# Altium PCB NB3000XN.PcbDoc (part 52 of 71)
Units mil, origin at the board's own origin, x right, y up, seen from the top; angles counter-clockwise.
Board outline 9527.56 x 6929.77 mil, 6 copper layers (Top Layer, GND+SHIELD, MidLayer1, MidLayer2, P2 - 3V3+5V0, Bottom Layer), stack 62.375 mil thick; 832 components, 1027 nets, 4655 pads, 4981 vias.
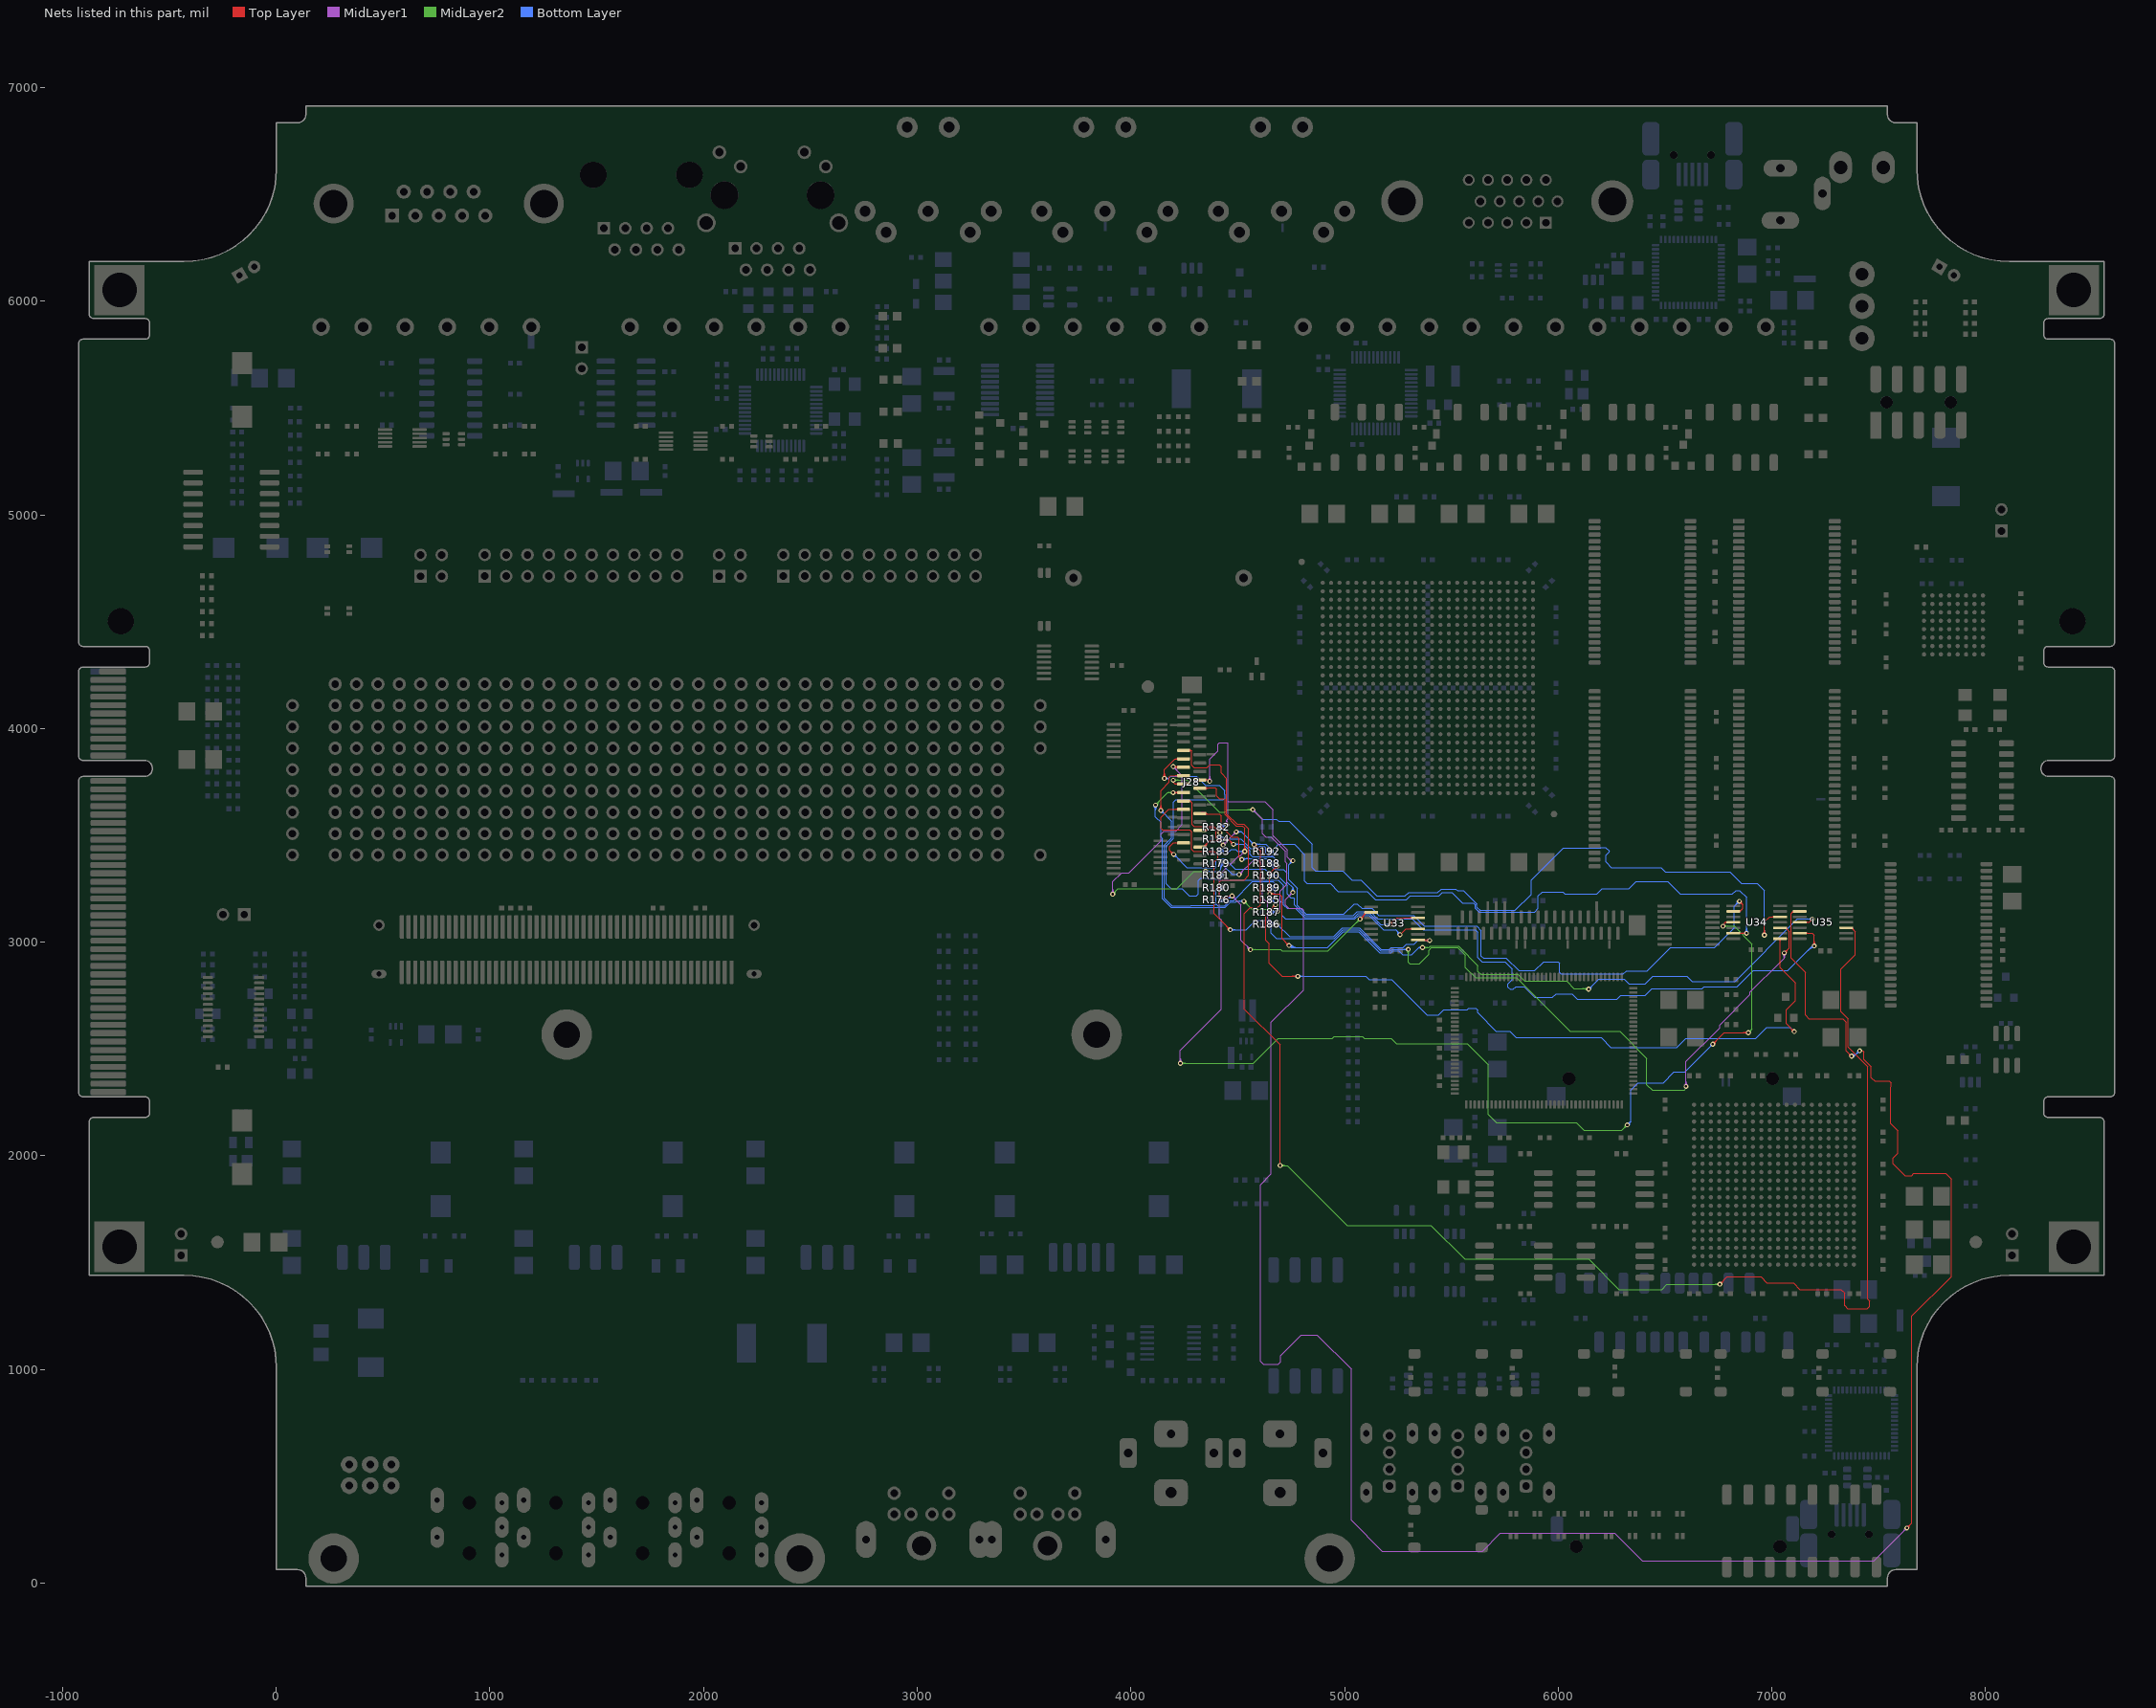
[diagram p56: the nets of this part, all layers, seen from the top]

## Via types
v1: diameter 23, hole 11.81, Top Layer to Bottom Layer, 3672 vias
v2: diameter 26, hole 11.81, Top Layer to Bottom Layer, 461 vias
v3: diameter 19, hole 11.81, Top Layer to Bottom Layer, tented both sides, 396 vias
v4: diameter 23.62, hole 11.81, Top Layer to Bottom Layer, 288 vias
v5: diameter 20, hole 11.81, Top Layer to Bottom Layer, 91 vias
v6: diameter 23, hole 11.81, Top Layer to Bottom Layer, tented both sides, 50 vias
v7: diameter 31, hole 11.81, Top Layer to Bottom Layer, 15 vias
v8: diameter 27.56, hole 11.81, Top Layer to Bottom Layer, tented both sides, 4 vias
v9: diameter 29, hole 11.81, Top Layer to Bottom Layer, 3 vias
v10: diameter 21, hole 11.81, Top Layer to Bottom Layer, 1 vias

## Nets (pads, with @x,y where several pads share a name; then routed paths per layer and width w, separated by ;. In a path a pad name is that pad's centre, name@x,y a point inside that pad or via, vN(x,y) a via of type N, cw(c..) or ccw(c..) an arc to the next point about the centre after c; other vN are vias at no path point) (continued)
LEDS#.LED2.RED: J28.13 R176.2 U33.2 | length 2543.8
  Top Layer w4: J28.13@4246.61,3897.64 4281.86,3897.64 ; J28.13@4273.12,3893.73 cw(c4281.86,3885.93) 4281.86,3897.64 ; J28.13@4273.12,3901.55 ccw(c4281.86,3909.34) 4281.86,3897.64 ; 4451.86,3210 4458.56,3216.71 ; v1(4473.52,3216.71) 4458.56,3216.71 ; v1(5073.52,3108.37) 5098.52,3133.37 ; v1@5073.52,3113.87 ccw(c5073.52,3127.15) 5082.91,3117.76 ccw(c5092.3,3108.37) v1@5079.02,3108.37 ; v1@5073.52,3117.87 ccw(c5073.52,3140.81) 5089.74,3124.59 ccw(c5105.96,3108.37) v1@5083.02,3108.37 ; 5087.42,3122.27 ccw(c5070.28,3139.41) U33.2@5094.52,3139.41 ; 5094.25,3129.1 ccw(c5083.94,3139.41) U33.2@5098.52,3139.41 ; U33.2@5096.97,3135.72 cw(c5095.97,3133.38) 5098.52,3133.38 ; U33.2@5100.08,3135.73 ccw(c5101.08,3133.38) 5098.52,3133.38 ; U33.2@5125,3139.41 U33.2@5098.52,3139.41 ; 4281.86,3897.64 4283.52,3895.97 4283.52,3828.71 4295.52,3816.71 4356.71,3816.71 4370.58,3830.58 4415,3830.58 4423.52,3822.06 4423.52,3791.71 4448.52,3766.71 4448.52,3606.71 4448.52,3601 4496.82,3552.71 4529.19,3552.71 4551.19,3530.71 4551.19,3312.9 4530,3291.71 4425.19,3291.71 4415.19,3281.71 4415.19,3216.71 4423.52,3208.37 4450.23,3208.37 4458.56,3216.71 ; 5098.52,3133.37 U33.2@5098.52,3139.41
  MidLayer1 w4: v1@4473.52,3207.21 cw(c4473.52,3184.27) 4489.74,3200.49 cw(c4505.96,3216.71) v1@4483.02,3216.71 ; v1@4473.52,3211.21 cw(c4473.52,3197.93) 4482.91,3207.32 cw(c4492.3,3216.71) v1@4479.02,3216.71 ; v1(4473.52,3216.71) 4515.19,3175.04 4515.19,3009.37 v1(4559.52,2965.04) ; v1@4550.02,2965.04 ccw(c4527.09,2965.04) 4543.31,2981.26 ccw(c4559.52,2997.48) v1@4559.52,2974.54 ; v1@4554.02,2965.04 ccw(c4540.75,2965.04) 4550.14,2974.43 ccw(c4559.52,2983.82) v1@4559.52,2970.54
  MidLayer2 w4: v1(4559.52,2965.04) 4700.19,2965.04 4706.86,2958.37 4923.52,2958.37 v1(5073.52,3108.37) ; v1@4563.41,2961.15 cw(c4572.8,2951.76) 4572.8,2965.04 cw(c4572.8,2978.32) v1@4563.41,2968.93 ; v1@4566.24,2958.32 cw(c4582.46,2942.11) 4582.46,2965.04 cw(c4582.46,2987.98) v1@4566.24,2971.76 ; v1@5064.02,3108.37 cw(c5041.09,3108.37) 5057.31,3092.16 cw(c5073.52,3075.94) v1@5073.52,3098.87 ; v1@5068.02,3108.37 cw(c5054.75,3108.37) 5064.14,3098.99 cw(c5073.52,3089.6) v1@5073.52,3102.87
  Bottom Layer w4: R176.2@4421.18,3198.75 4440.86,3198.75 ; R176.2@4428.39,3192.85 cw(c4440.86,3182.64) 4440.86,3198.75 ; R176.2@4428.39,3204.65 ccw(c4440.86,3214.86) 4440.86,3198.75 ; 4455.42,3208.37 ccw(c4455.42,3221.63) v1@4468.22,3218.15 ; 4460.66,3208.37 ccw(c4460.66,3220.21) v1@4472.08,3217.1 ; v1@4464.36,3219.2 cw(c4450.19,3223.06) 4450.19,3208.37 ; v1(4473.52,3216.71) 4465.19,3208.37 4450.19,3208.37 ; 4440.86,3198.75 4440.86,3199.04 4450.19,3208.37
LEDS#.LED3.BLUE: J28.19 R180.2 U33.10 | length 2457.1
  Top Layer w4: v1@4133.47,3623.43 ccw(c4117.26,3639.64) 4140.19,3639.64 ccw(c4163.13,3639.64) v1@4146.91,3623.43 ; v1@4136.3,3620.6 ccw(c4126.91,3629.99) 4140.19,3629.99 ccw(c4153.47,3629.99) v1@4144.08,3620.6 ; v1(4140.19,3616.71) 4140.19,3710.19 4180,3750 4180,3775 4185,3780 4246.14,3780 J28.19@4246.61,3779.53 ; 4209.17,3780 cw(c4209.17,3764.21) J28.19@4220.33,3775.37 ; 4211.45,3780 ccw(c4211.45,3792.57) J28.19@4220.33,3783.68 ; v1(5260,3035) 5260.15,3035 5287.79,3062.64 U33.10@5343.5,3062.64 ; U33.10@5314.2,3059.81 ccw(c5307.37,3052.98) 5307.37,3062.64 ccw(c5307.37,3072.29) U33.10@5314.2,3065.47
  Bottom Layer w4: v1@4140.19,3607.21 cw(c4140.19,3584.27) 4156.41,3600.49 cw(c4172.63,3616.71) v1@4149.69,3616.71 ; v1@4140.19,3611.21 cw(c4140.19,3597.93) 4149.58,3607.32 cw(c4158.97,3616.71) v1@4145.69,3616.71 ; v1(4140.19,3616.71) 4190.19,3566.71 4190.19,3487.37 4156.86,3454.04 4156.86,3235 4156.86,3206 4191.82,3171.04 4281.04,3171.04 4281.37,3171.37 4390.19,3171.37 4398.52,3179.71 ; R180.2@4412.74,3251.67 ccw(c4406.52,3248.76) 4406.52,3255.62 ; R180.2@4412.74,3259.58 cw(c4406.52,3262.49) 4406.52,3255.62 ; R180.2@4421.18,3255.62 4406.52,3255.62 ; 5241.26,3057.3 cw(c5218.96,3035) v1@5250.5,3035 ; 5248.09,3050.47 cw(c5232.62,3035) v1@5254.5,3035 ; 5249.87,3048.7 ccw(c5260,3058.83) v1@5260,3044.5 ; v1(5260,3035) 5260.15,3035.15 5260.15,3038.42 5240.19,3058.37 5182.86,3058.37 5115.19,3126.04 5066.19,3126.04 5048.52,3108.37 4723.52,3108.37 4706.86,3125.04 4706.86,3183.37 4673.52,3216.71 4673.52,3275.04 4665.19,3283.37 4569.86,3283.37 4481.86,3195.37 4462.9,3195.37 4438.56,3171.04 4407.19,3171.04 4403.19,3175.04 4398.52,3179.71 ; 4398.52,3179.71 4398.52,3247.62 4406.52,3255.62
LEDS#.LED3.GREEN: J28.15 R181.2 U33.12 | length 2846.8
  Top Layer w4: v1@4150.14,3773.43 ccw(c4133.92,3789.64) 4156.86,3789.64 ccw(c4179.79,3789.64) v1@4163.57,3773.43 ; v1@4152.97,3770.6 ccw(c4143.58,3779.99) 4156.86,3779.99 ccw(c4170.14,3779.99) v1@4160.75,3770.6 ; v1(4156.86,3766.71) 4156.86,3808.37 4206.75,3858.27 J28.15@4246.61,3858.27 J28.15@4248.52,3858.27 ; J28.15@4220.33,3854.11 ccw(c4210.31,3844.09) 4210.31,3858.27 ccw(c4210.31,3872.45) J28.15@4220.33,3862.42 ; v1(5215.19,3083.37) 5245.64,3113.82 U33.12@5343.5,3113.82 ; v1@5215.19,3088.87 ccw(c5215.19,3102.15) 5224.58,3092.76 ccw(c5233.97,3083.37) v1@5220.69,3083.37 ; v1@5215.19,3092.87 ccw(c5215.19,3115.81) 5231.41,3099.59 ccw(c5247.63,3083.37) v1@5224.69,3083.37 ; U33.12@5314.2,3110.99 ccw(c5307.37,3104.16) 5307.37,3113.82 ccw(c5307.37,3123.48) U33.12@5314.2,3116.65
  Bottom Layer w4: v1(4156.86,3766.71) 4175.67,3766.71 ; v1@4164.5,3761.07 cw(c4175.67,3752.84) 4175.67,3766.71 ; v1@4164.5,3772.35 ccw(c4175.67,3780.58) 4175.67,3766.71 ; R181.2@4421.18,3312.5 4421.18,3299.71 4415.85,3294.37 ; 4440,3692.63 4440,3708.69 4415.31,3733.37 4348.52,3733.37 4305.86,3776.04 4185,3776.04 4175.67,3766.71 ; 4440.19,3692.63 4440.19,3674.04 4432.86,3666.71 4211.71,3666.71 4200,3655 4200,3485.87 4164.86,3450.73 4164.86,3272.39 4187.21,3250.04 4240.19,3250.04 4273.52,3216.71 4306.86,3216.71 4315.19,3225.04 4315.19,3287.71 4327.52,3300.04 4357.86,3300.04 4363.52,3294.37 4415.85,3294.37 ; v1@5208.47,3076.66 ccw(c5192.26,3060.44) 5192.26,3083.37 ccw(c5192.26,3106.31) v1@5208.47,3090.09 ; v1@5211.3,3079.49 ccw(c5201.91,3070.1) 5201.91,3083.37 ccw(c5201.91,3096.65) v1@5211.3,3087.26 ; v1(5215.19,3083.37) 5169.17,3083.37 5118.5,3134.04 5062.88,3134.04 5045.21,3116.37 4812.54,3116.37 4770.54,3158.37 4731.86,3158.37 4715.19,3175.04 4715.19,3266.71 4690.19,3291.71 4418.51,3291.71 4415.85,3294.37
LEDS#.LED3.RED: J28.17 R179.2 U33.8 | length 3712.4
  Top Layer w4: v1(4198.19,3822.04) 4201.86,3818.37 v1@4205.19,3818.37 ; v1@4199.25,3823.1 ccw(c4209.4,3833.25) 4209.4,3818.9 ; v1@4202.08,3825.93 ccw(c4219.06,3842.91) J28.17@4219.06,3818.9 ; v1@4204.91,3815.32 cw(c4213.54,3806.69) 4213.54,3818.9 ; v1@4204.91,3828.76 ccw(c4228.71,3852.56) J28.17@4228.71,3818.9 ; v1@4205.71,3818.9 J28.17@4246.61,3818.9 ; J28.17@4220.33,3814.74 ccw(c4210.31,3804.72) 4210.31,3818.9 ccw(c4210.31,3833.08) J28.17@4220.33,3823.05 ; U33.8@5343.5,3011.46 5340.19,3011.46 5340.19,3008.37 5343.5,3008.37 v1(5398.52,3008.37) ; U33.8@5369.98,3011.46 ccw(c5377.43,3018.9) 5377.43,3008.37 ; U33.8@5372.81,3014.29 ccw(c5387.08,3028.56) v1@5387.08,3008.37 ; v1@5391.81,3001.66 ccw(c5375.59,2985.44) 5375.59,3008.37 ccw(c5375.59,3031.31) v1@5391.81,3015.09 ; v1@5394.64,3004.49 ccw(c5385.25,2995.1) 5385.25,3008.37 ccw(c5385.25,3021.65) v1@5394.64,3012.26
  MidLayer1 w4: v1@3908.47,3231.76 ccw(c3892.26,3247.98) 3915.19,3247.98 ccw(c3938.13,3247.98) v1@3921.91,3231.76 ; v1@3911.3,3228.93 ccw(c3901.91,3238.32) 3915.19,3238.32 ccw(c3928.47,3238.32) v1@3919.08,3228.93 ; v1(3915.19,3225.04) 3915.19,3283.37 3956.86,3325.04 3991.19,3325.04 4140.19,3474.04 4140.19,3505.04 4155.15,3520 4210.15,3520 4240.19,3550.04 4240.19,3780.04 v1(4198.19,3822.04) ; v1@4198.19,3812.54 cw(c4198.19,3789.61) 4214.41,3805.82 cw(c4230.63,3822.04) v1@4207.69,3822.04 ; v1@4198.19,3816.54 cw(c4198.19,3803.26) 4207.58,3812.65 cw(c4216.97,3822.04) v1@4203.69,3822.04 ; v1(4506.86,3316.71) 4573.52,3383.37 4598.52,3383.37 4615.19,3366.71 4615.19,3208.37 4640.19,3183.37 4640.19,3108.37 4665.19,3083.37 ; v1@4506.86,3322.21 ccw(c4506.86,3335.49) 4516.25,3326.1 ccw(c4525.64,3316.71) v1@4512.36,3316.71 ; v1@4506.86,3326.21 ccw(c4506.86,3349.14) 4523.07,3332.93 ccw(c4539.29,3316.71) v1@4516.36,3316.71 ; v1@4678.24,3077.28 ccw(c4665.19,3066.37) 4665.19,3083.37 ; v1@4678.24,3089.47 cw(c4665.19,3100.38) 4665.19,3083.37 ; v1@4681.31,3079.85 ccw(c4673.75,3073.53) 4673.75,3083.37 ccw(c4673.75,3093.22) v1@4681.31,3086.9 ; v1(4685.52,3083.37) 4665.19,3083.37
  MidLayer2 w4: v1(3915.19,3225.04) 3940.52,3250.37 4214.19,3250.37 4295.19,3331.37 v1(4349.52,3331.37) ; v1@3915.19,3230.54 ccw(c3915.19,3243.82) 3924.58,3234.43 ccw(c3933.97,3225.04) v1@3920.69,3225.04 ; v1@3915.19,3234.54 ccw(c3915.19,3257.48) 3931.41,3241.26 ccw(c3947.63,3225.04) v1@3924.69,3225.04 ; v1@4342.81,3324.66 ccw(c4326.59,3308.44) 4326.59,3331.37 ccw(c4326.59,3354.31) v1@4342.81,3338.09 ; v1@4345.64,3327.49 ccw(c4336.25,3318.1) 4336.25,3331.37 ccw(c4336.25,3344.65) v1@4345.64,3335.26
  Bottom Layer w4: v1(4349.52,3331.37) 4411.37,3331.37 4421.18,3341.18 R179.2@4421.18,3369.38 ; v1@4353.41,3327.49 cw(c4362.8,3318.1) 4362.8,3331.37 cw(c4362.8,3344.65) v1@4353.41,3335.26 ; v1@4356.24,3324.66 cw(c4372.46,3308.44) 4372.46,3331.37 cw(c4372.46,3354.31) v1@4356.24,3338.09 ; R179.2@4414.59,3362.29 cw(c4398.68,3346.39) 4421.18,3346.39 cw(c4443.68,3346.39) R179.2@4427.77,3362.29 ; R179.2@4417.42,3365.12 cw(c4408.34,3356.04) 4421.18,3356.04 cw(c4434.02,3356.04) R179.2@4424.94,3365.12 ; R179.2@4421.18,3359.56 cw(c4421.18,3335.88) 4437.93,3352.63 ; R179.2@4421.18,3363.56 cw(c4421.18,3349.54) R179.2@4431.1,3359.46 ; R179.2@4426.5,3368.88 ccw(c4438.15,3368.88) R179.2@4429.91,3360.64 ; R179.2@4429.85,3360.7 4473.85,3316.71 v1(4506.86,3316.71) ; R179.2@4430.5,3368.88 ccw(c4451.81,3368.88) 4436.74,3353.81 ; v1@4500.14,3309.99 ccw(c4483.92,3293.77) 4483.92,3316.71 ccw(c4483.92,3339.64) v1@4500.14,3323.43 ; v1@4502.97,3312.82 ccw(c4493.58,3303.43) 4493.58,3316.71 ccw(c4493.58,3329.99) v1@4502.97,3320.6 ; v1@4685.52,3073.87 cw(c4685.52,3050.94) 4701.74,3067.16 cw(c4717.96,3083.37) v1@4695.02,3083.37 ; v1@4685.52,3077.87 cw(c4685.52,3064.6) 4694.91,3073.99 cw(c4704.3,3083.37) v1@4691.02,3083.37 ; v1(4685.52,3083.37) 4743.19,3025.71 4948.52,3025.71 4989.52,3066.71 5071.15,3066.71 5171.48,2966.37 5210.93,2966.37 5219.37,2974.81 5273.29,2974.81 5290.19,2991.71 5326.5,2991.71 5343.17,3008.37 v1(5398.52,3008.37) ; v1@5391.81,3001.66 ccw(c5375.59,2985.44) 5375.59,3008.37 ccw(c5375.59,3031.31) v1@5391.81,3015.09 ; v1@5394.64,3004.49 ccw(c5385.25,2995.1) 5385.25,3008.37 ccw(c5385.25,3021.65) v1@5394.64,3012.26
LEDS#.LED4.BLUE: J28.22 R183.2 U34.4 | length 6447.5
  Top Layer w4: J28.22@4323.39,3720.47 4361.39,3720.47 4364.79,3723.88 4395,3723.88 4401.5,3717.38 4401.5,3695 ; J28.22@4349.67,3716.32 cw(c4359.69,3706.29) 4359.69,3720.47 cw(c4359.69,3734.66) J28.22@4349.67,3724.63 ; 4401.5,3705 4401.5,3695 ; v1@4526.47,3431.76 ccw(c4510.26,3447.98) 4533.19,3447.98 ccw(c4556.13,3447.98) v1@4539.91,3431.76 ; v1@4529.3,3428.93 ccw(c4519.91,3438.32) 4533.19,3438.32 ccw(c4546.47,3438.32) v1@4537.08,3428.93 ; v1(4533.19,3425.04) 4533.19,3534.37 4522.86,3544.71 4493.5,3544.71 4440.19,3598.02 4440.19,3666.81 4435,3672 4415,3672 4401.5,3685.5 4401.5,3695 ; v1(6723.86,2523.04) 6777.52,2576.71 v1(6890.19,2576.71) ; v1@6723.86,2528.54 ccw(c6723.86,2541.82) 6733.25,2532.43 ccw(c6742.64,2523.04) v1@6729.36,2523.04 ; v1@6723.86,2532.54 ccw(c6723.86,2555.48) 6740.07,2539.26 ccw(c6756.29,2523.04) v1@6733.36,2523.04 ; v1(6771.52,3075.04) 6779.52,3083.04 6779.52,3090.89 6781.85,3093.23 U34.4@6820,3093.23 ; U34.4@6790.69,3090.4 ccw(c6783.86,3083.57) 6783.86,3093.23 ccw(c6783.86,3102.89) U34.4@6790.69,3096.06 ; v1@6883.47,2569.99 ccw(c6867.26,2553.77) 6867.26,2576.71 ccw(c6867.26,2599.64) v1@6883.47,2583.43 ; v1@6886.3,2572.82 ccw(c6876.91,2563.43) 6876.91,2576.71 ccw(c6876.91,2589.99) v1@6886.3,2580.6
  MidLayer1 w4: v1@4225.14,2440.09 ccw(c4208.92,2456.31) 4231.86,2456.31 ccw(c4254.79,2456.31) v1@4238.57,2440.09 ; v1@4227.97,2437.26 ccw(c4218.58,2446.65) 4231.86,2446.65 ccw(c4245.14,2446.65) v1@4235.75,2437.26 ; v1(4231.86,2433.37) 4231.86,2494.08 4423.52,2685.75 4423.52,3104.1 4415.19,3112.44 4415.19,3315.04 4505.15,3405 ; 4505,3405 4505.15,3405 ; v1@4523.69,3425.04 cw(c4500.76,3425.04) 4516.97,3408.82 cw(c4533.19,3392.61) v1@4533.19,3415.54 ; v1@4527.69,3425.04 cw(c4514.41,3425.04) 4523.8,3415.65 cw(c4533.19,3406.26) v1@4533.19,3419.54 ; v1(4533.19,3425.04) 4513.15,3405 4505.15,3405
  MidLayer2 w4: v1(4231.86,2433.37) 4573.52,2433.37 4689.52,2549.37 4943.31,2549.37 4951.94,2558 5083.55,2558 5092.05,2549.5 5218.19,2549.5 5242.65,2525.04 5574.52,2525.04 5673.52,2426.04 5673.52,2192.79 5711.94,2154.37 6085.86,2154.37 6120.23,2120 6298.82,2120 v1(6323.52,2144.71) ; v1@4235.75,2429.49 cw(c4245.14,2420.1) 4245.14,2433.37 cw(c4245.14,2446.65) v1@4235.75,2437.26 ; v1@4238.57,2426.66 cw(c4254.79,2410.44) 4254.79,2433.37 cw(c4254.79,2456.31) v1@4238.57,2440.09 ; v1@6314.02,2144.71 cw(c6291.09,2144.71) 6307.31,2128.49 cw(c6323.52,2112.27) v1@6323.52,2135.21 ; v1@6318.02,2144.71 cw(c6304.75,2144.71) 6314.14,2135.32 cw(c6323.52,2125.93) v1@6323.52,2139.21 ; v1(6771.52,3075.04) 6823.52,3075.04 6906.86,2991.71 6906.86,2593.37 v1(6890.19,2576.71) ; v1@6775.41,3071.15 cw(c6784.8,3061.76) 6784.8,3075.04 cw(c6784.8,3088.32) v1@6775.41,3078.93 ; v1@6778.24,3068.32 cw(c6794.46,3052.11) 6794.46,3075.04 cw(c6794.46,3097.98) v1@6778.24,3081.76 ; v1@6890.19,2582.21 ccw(c6890.19,2595.49) 6899.58,2586.1 ccw(c6908.97,2576.71) v1@6895.69,2576.71 ; v1@6890.19,2586.21 ccw(c6890.19,2609.14) 6906.41,2592.93 ccw(c6922.63,2576.71) v1@6899.69,2576.71
  Bottom Layer w4: R183.2@4421.18,3426.25 4461.25,3426.25 4470,3435 4490,3435 4499.96,3425.04 v1(4533.19,3425.04) ; R183.2@4424.94,3422.49 cw(c4434.02,3413.41) 4434.02,3426.25 cw(c4434.02,3439.09) R183.2@4424.94,3430.01 ; R183.2@4427.77,3419.66 cw(c4443.68,3403.75) 4443.68,3426.25 cw(c4443.68,3448.75) R183.2@4427.77,3432.84 ; v1@4526.47,3418.32 ccw(c4510.26,3402.11) 4510.26,3425.04 ccw(c4510.26,3447.98) v1@4526.47,3431.76 ; v1@4529.3,3421.15 ccw(c4519.91,3411.76) 4519.91,3425.04 ccw(c4519.91,3438.32) v1@4529.3,3428.93 ; v1(6323.52,2144.71) 6340.19,2161.37 6340.19,2308.88 6373.35,2342.04 6492.9,2342.04 6542.9,2392.04 6592.86,2392.04 v1(6723.86,2523.04) ; v1@6323.52,2150.21 ccw(c6323.52,2163.49) 6332.91,2154.1 ccw(c6342.3,2144.71) v1@6329.02,2144.71 ; v1@6323.52,2154.21 ccw(c6323.52,2177.14) 6339.74,2160.93 ccw(c6355.96,2144.71) v1@6333.02,2144.71 ; v1@6714.36,2523.04 cw(c6691.42,2523.04) 6707.64,2506.82 cw(c6723.86,2490.61) v1@6723.86,2513.54 ; v1@6718.36,2523.04 cw(c6705.08,2523.04) 6714.47,2513.65 cw(c6723.86,2504.26) v1@6723.86,2517.54
LEDS#.LED4.GREEN: J28.25 R184.2 U34.6 | length 3853.9
  Top Layer w4: J28.25@4246.61,3661.42 4277.34,3661.42 ; J28.25@4268.58,3663.54 cw(c4269.58,3650.05) 4279.14,3659.61 ; J28.25@4268.88,3659.55 cw(c4270.43,3638.55) 4285.31,3653.44 ; J28.25@4270.04,3660.07 cw(c4274.36,3655.6) 4278.76,3660 ; J28.25@4272.82,3657.19 cw(c4277.19,3652.67) 4281.63,3657.12 ; J28.25@4274.21,3659.28 cw(c4277.34,3658.06) 4277.34,3661.42 ; J28.25@4274.21,3663.55 ccw(c4277.34,3664.77) 4277.34,3661.42 ; v1(4416.52,3512.04) 4386.86,3541.71 4295.52,3541.71 4287.19,3550.04 4287.19,3651.56 4277.34,3661.42 ; U34.6@6820,3042.05 6823.52,3042.05 6823.52,3041.71 v1(6881.86,3041.71) ; U34.6@6849.31,3039.22 cw(c6855.32,3033.21) 6855.32,3041.71 ; U34.6@6849.31,3044.88 ccw(c6856.96,3052.53) 6856.96,3041.71 ; v1@6875.14,3034.99 ccw(c6858.92,3018.77) 6858.92,3041.71 ccw(c6858.92,3064.64) v1@6875.14,3048.43 ; v1@6877.97,3037.82 ccw(c6868.58,3028.43) 6868.58,3041.71 ccw(c6868.58,3054.99) v1@6877.97,3045.6
  Bottom Layer w4: v1@4410.62,3504.6 cw(c4393.31,3482.75) R184.2@4421.18,3482.75 ; v1@4413.11,3507.73 cw(c4399.87,3491.03) R184.2@4421.18,3491.03 ; R184.2@4414.59,3490.21 ccw(c4398.68,3506.12) 4421.18,3506.12 ccw(c4443.68,3506.11) R184.2@4427.77,3490.21 ; v1@4415.59,3510.87 cw(c4406.43,3499.3) 4421.18,3499.3 ; v1(4416.52,3512.04) 4421.18,3507.38 R184.2@4421.18,3483.12 4421.26,3483.04 4515.52,3483.04 4559.86,3438.71 4594.19,3438.71 4605.52,3450.04 4623.52,3450.04 4631.86,3441.71 4631.86,3416.71 4640.19,3408.37 4671.86,3408.37 4673.52,3410.04 4680,3416.52 4680,3448.18 4690.19,3458.37 4765.19,3458.37 4813.52,3410.04 4813.52,3286.48 4824.96,3275.04 4932.86,3275.04 4970.52,3237.37 5107.19,3237.37 5144.52,3200.04 5290.19,3200.04 5306.86,3216.71 5442.52,3216.71 5458.86,3233.04 5502.86,3233.04 5552.52,3183.37 5603.88,3183.37 5612.21,3175.04 5612.21,3159.69 5613.52,3158.37 5630.86,3141.04 5889.52,3141.04 5906.86,3158.37 5906.86,3216.71 5925.15,3235 6021.9,3235 6031.86,3225.04 6181.86,3225.04 6206.86,3250.04 6331.86,3250.04 6365.19,3283.37 6513.31,3283.37 6571.65,3225.04 6815.19,3225.04 6832.86,3242.71 6848.52,3242.71 6881.86,3209.37 v1(6881.86,3041.71) ; R184.2@4417.42,3487.38 ccw(c4408.34,3496.46) 4421.18,3496.46 ccw(c4434.02,3496.46) R184.2@4424.94,3487.38 ; 4421.18,3500.35 cw(c4428.22,3500.35) v1@4423.24,3505.32 ; R184.2@4424.94,3479.36 cw(c4433.82,3470.49) 4433.82,3483.04 ; R184.2@4424.94,3486.89 ccw(c4434.23,3496.17) 4434.23,3483.04 ; R184.2@4427.77,3476.54 cw(c4443.48,3460.83) 4443.48,3483.04 ; R184.2@4427.77,3489.71 ccw(c4443.88,3505.83) 4443.88,3483.04 ; v1@6875.14,3048.43 ccw(c6858.92,3064.64) 6881.86,3064.64 ccw(c6904.79,3064.64) v1@6888.57,3048.43 ; v1@6877.97,3045.6 ccw(c6868.58,3054.99) 6881.86,3054.99 ccw(c6895.14,3054.99) v1@6885.75,3045.6
LEDS#.LED4.RED: J28.20 R182.2 U34.2 | length 4544
  Top Layer w4: J28.20@4323.39,3759.84 4355.52,3759.84 ; J28.20@4350.64,3756.98 cw(c4355.52,3754.25) 4355.52,3759.84 ; J28.20@4350.64,3762.71 ccw(c4355.52,3765.44) 4355.52,3759.84 ; v1(4369.19,3753.04) 4360.86,3761.37 4357.06,3761.37 4355.52,3759.84 ; U34.2@6820,3144.41 6823.52,3144.41 6823.52,3141.71 6848.52,3141.71 6865.19,3158.37 6865.19,3174.37 v1(6847.86,3191.71) ; U34.2@6846.48,3144.41 ccw(c6846.48,3155.87) 6854.58,3147.77 ; U34.2@6846.48,3148.41 ccw(c6846.48,3169.52) 6861.41,3154.59 ; v1@6847.86,3182.21 cw(c6847.86,3159.27) 6864.07,3175.49 cw(c6880.29,3191.71) v1@6857.36,3191.71 ; v1@6847.86,3186.21 cw(c6847.86,3172.93) 6857.25,3182.32 cw(c6866.64,3191.71) v1@6853.36,3191.71
  MidLayer1 w4: v1@4362.47,3759.76 ccw(c4346.26,3775.98) 4369.19,3775.98 ccw(c4392.13,3775.98) v1@4375.91,3759.76 ; v1@4365.3,3756.93 ccw(c4355.91,3766.32) 4369.19,3766.32 ccw(c4382.47,3766.32) v1@4373.08,3756.93 ; v1(4369.19,3753.04) 4369.19,3856.75 4406.86,3894.41 4406.86,3926.04 4415.19,3934.37 4453.52,3934.37 4454.52,3933.37 4454.52,3660 ; v1@4442.42,3557.32 ccw(c4431.47,3570.39) 4448.52,3570.39 ; v1@4444.99,3554.26 ccw(c4438.65,3561.82) 4448.52,3561.82 ccw(c4458.4,3561.82) v1@4452.06,3554.26 ; v1(4448.52,3550.04) 4448.52,3570.39 ; v1@4454.63,3557.32 cw(c4465.58,3570.39) 4448.52,3570.39 ; 4736.86,3393.04 ccw(c4747.85,3404.03) v1@4754.48,3389.97 ; 4740.88,3389.02 ccw(c4750.43,3398.56) v1@4756.18,3386.35 ; 4744.9,3384.99 ccw(c4753,3393.09) v1@4757.88,3382.73 ; v1(4758.52,3381.37) 4748.52,3381.37 4731.86,3398.04 4731.86,3432.37 4665.19,3499.04 4665.19,3619.37 4626.19,3658.37 4456.15,3658.37 4454.52,3660 ; 4448.52,3570.39 4454.52,3576.39 4454.52,3660
  Bottom Layer w4: R182.2@4419.71,3538.25 ccw(c4425.57,3547.16) 4433.1,3539.62 ; R182.2@4421.18,3540 4433.48,3540 v1@4443.52,3550.04 ; R182.2@4421.91,3541.59 ccw(c4428.32,3551.35) 4436.58,3543.09 ; R182.2@4424.1,3544.94 ccw(c4431.08,3555.54) v1@4440.05,3546.57 ; R182.2@4426.3,3548.28 ccw(c4433.83,3559.73) v1@4443.52,3550.04 ; v1(4448.52,3550.04) v1@4443.52,3550.04 ; v1@4749.02,3381.37 cw(c4726.09,3381.37) 4742.31,3365.16 cw(c4758.52,3348.94) v1@4758.52,3371.87 ; v1@4753.02,3381.37 cw(c4739.75,3381.37) 4749.14,3371.99 cw(c4758.52,3362.6) v1@4758.52,3375.87 ; v1(4758.52,3381.37) 4739.19,3362.04 4739.19,3292.71 4779.86,3252.04 4779.86,3171.69 4819.17,3132.37 4997.52,3132.37 5045.15,3180 5059.23,3180 5081.19,3158.04 5128.45,3158.04 5161.11,3125.37 5323.19,3125.37 5373.52,3075.04 5618.17,3075.04 5640.19,3053.02 5640.19,2934.81 ; 5640,2935 5640.19,2934.81 ; v1@6838.36,3191.71 cw(c6815.42,3191.71) 6831.64,3175.49 cw(c6847.86,3159.27) v1@6847.86,3182.21 ; v1@6842.36,3191.71 cw(c6829.08,3191.71) 6838.47,3182.32 cw(c6847.86,3172.93) v1@6847.86,3186.21 ; v1(6847.86,3191.71) 6823.52,3167.37 6823.52,3066.71 6731.86,2975.04 6525.19,2975.04 6416.52,2866.37 6319.86,2866.37 6305.52,2852.04 6013.19,2852.04 6006.86,2858.37 6006.86,2901.04 5999.52,2908.37 5931.67,2908.37 5890,2866.71 5815.19,2866.71 5756.9,2925 5650,2925 5640.19,2934.81
LEDS#.LED5.BLUE: J28.27 R186.2 U34.10 | length 5213.7
  Top Layer w4: J28.27@4220.33,3617.89 ccw(c4210.31,3607.87) 4210.31,3622.05 ccw(c4210.31,3636.23) J28.27@4220.33,3626.2 ; J28.27@4246.61,3622.05 4177.05,3622.05 4140.19,3585.19 4140.19,3532.37 4147.52,3525.04 4276.52,3525.04 4284.86,3516.71 4284.86,3433.37 4293.19,3425.04 4390.19,3425.04 4406.86,3408.37 4406.86,3391.71 4390.19,3375.04 4390.19,3133.37 v1(4465.19,3058.37) ; v1@4455.69,3058.37 ccw(c4432.76,3058.37) 4448.97,3074.59 ccw(c4465.19,3090.81) v1@4465.19,3067.87 ; v1@4459.69,3058.37 ccw(c4446.41,3058.37) 4455.8,3067.76 ccw(c4465.19,3077.15) v1@4465.19,3063.87 ; U34.10@7038.5,3067.64 7040.19,3067.64 7040.19,3066.71 7065.19,3066.71 7081.86,3050.04 7081.86,2973.71 v1(7058.19,2950.04) ; v1@7058.19,2955.54 ccw(c7058.19,2968.82) 7067.58,2959.43 ccw(c7076.97,2950.04) v1@7063.69,2950.04 ; v1@7058.19,2959.54 ccw(c7058.19,2982.48) 7074.41,2966.26 ccw(c7090.63,2950.04) v1@7067.69,2950.04 ; U34.10@7064.98,3063.64 cw(c7064.98,3055.73) 7070.58,3061.32 ; U34.10@7068.98,3067.64 ccw(c7080.39,3067.64) 7072.33,3059.57
  MidLayer1 w4: v1@6591.81,2331.76 ccw(c6575.59,2347.98) 6598.52,2347.98 ccw(c6621.46,2347.98) v1@6605.24,2331.76 ; v1@6594.64,2328.93 ccw(c6585.25,2338.32) 6598.52,2338.32 ccw(c6611.8,2338.32) v1@6602.41,2328.93 ; v1(6598.52,2325.04) 6598.52,2441.71 6755.87,2599.05 6755.87,2612.74 6898.52,2755.39 6898.52,2766.71 7042.94,2911.12 7058.19,2926.37 v1(7058.19,2950.04) ; v1@7051.47,2943.32 cw(c7035.26,2927.11) 7058.19,2927.11 cw(c7081.13,2927.11) v1@7064.91,2943.32 ; v1@7054.3,2946.15 cw(c7044.91,2936.76) 7058.19,2936.76 cw(c7071.47,2936.76) v1@7062.08,2946.15
  MidLayer2 w4: v1@5291.81,2959.99 cw(c5275.59,2943.77) 5298.52,2943.77 cw(c5321.46,2943.77) v1@5305.24,2959.99 ; v1@5294.64,2962.82 cw(c5285.25,2953.43) 5298.52,2953.43 cw(c5311.8,2953.43) v1@5302.41,2962.82 ; v1(5298.52,2966.71) 5298.52,2906.48 5305,2900 5350.34,2900 5394.29,2943.95 5394.29,2962.29 5406,2974 5529.69,2974 5565.19,2938.5 5565.19,2882.04 5613.86,2833.37 5805.25,2833.37 6055.25,2583.37 6288.19,2583.37 6415.19,2456.37 6415.19,2333.37 6440.19,2308.37 6590.86,2308.37 6598.52,2316.04 v1(6598.52,2325.04)
  Bottom Layer w4: v1(4465.19,3058.37) 4540.19,3058.37 4585.49,3103.68 4650.86,3103.68 4656.86,3097.68 4656.86,3041.71 4680.86,3017.71 4951.84,3017.71 4992.51,3058.37 5068.17,3058.37 5168.17,2958.37 5214.25,2958.37 5222.68,2966.81 5255.18,2966.81 5255.29,2966.71 v1(5298.52,2966.71) ; v1@4469.08,3054.49 cw(c4478.47,3045.1) 4478.47,3058.37 cw(c4478.47,3071.65) v1@4469.08,3062.26 ; v1@4471.91,3051.66 cw(c4488.13,3035.44) 4488.13,3058.37 cw(c4488.13,3081.31) v1@4471.91,3065.09 ; R186.2@4649.59,3077.92 cw(c4632.05,3060.38) 4656.86,3060.38 ; 4652.33,3102.2 cw(c4642.4,3092.28) R186.2@4655,3086.07 ; R186.2@4652.42,3080.75 cw(c4641.71,3070.03) 4656.86,3070.03 ; R186.2@4656.18,3085 4656.18,3097.01 4656.85,3097.68 ; 4656.28,3098.25 cw(c4647.69,3089.67) R186.2@4658.59,3084.31 ; 4656.86,3063.64 cw(c4677.05,3063.64) R186.2@4662.77,3077.92 ; v1@5291.81,2959.99 ccw(c5275.59,2943.77) 5275.59,2966.71 ccw(c5275.59,2989.64) v1@5291.81,2973.43 ; v1@5294.64,2962.82 ccw(c5285.25,2953.43) 5285.25,2966.71 ccw(c5285.25,2979.99) v1@5294.64,2970.6
LEDS#.LED5.GREEN: J28.21 R187.2 U34.12 | length 4945.4
  Top Layer w4: v1(4198.52,3758.37) 4198.52,3748.16 4206.52,3740.16 J28.21@4246.61,3740.16 ; J28.21@4220.33,3736 ccw(c4210.31,3725.98) 4210.31,3740.16 ccw(c4210.31,3754.34) J28.21@4220.33,3744.31 ; v1@6958.47,3040.09 ccw(c6942.26,3056.31) 6965.19,3056.31 ccw(c6988.13,3056.31) v1@6971.91,3040.09 ; v1@6961.3,3037.26 ccw(c6951.91,3046.65) 6965.19,3046.65 ccw(c6978.47,3046.65) v1@6969.08,3037.26 ; v1(6965.19,3033.37) 6965.19,3095.19 6988.82,3118.82 U34.12@7038.5,3118.82 U34.12@7040.19,3118.82 ; U34.12@7009.2,3115.99 ccw(c7002.37,3109.16) 7002.37,3118.82 ccw(c7002.37,3128.48) U34.12@7009.2,3121.65
  MidLayer1 w4: v1@4570.52,3611.21 cw(c4570.52,3588.27) 4586.74,3604.49 cw(c4602.96,3620.71) v1@4580.02,3620.71 ; v1@4570.52,3615.21 cw(c4570.52,3601.93) 4579.91,3611.32 cw(c4589.3,3620.71) v1@4576.02,3620.71 ; v1(4570.52,3620.71) 4615.19,3576.04 4615.19,3508.37 4631.86,3491.71 4656.86,3491.71 4723.52,3425.04 4723.52,3375.04 4731.19,3367.37 4731.19,3271.37 4698.52,3238.71 4698.52,3156.04 v1(4686.19,3143.71)
  MidLayer2 w4: v1(4198.52,3758.37) 4265.19,3758.37 4415.19,3608.37 4440.19,3608.37 4452.52,3620.71 v1(4570.52,3620.71) ; v1@4202.41,3754.49 cw(c4211.8,3745.1) 4211.8,3758.37 cw(c4211.8,3771.65) v1@4202.41,3762.26 ; v1@4205.24,3751.66 cw(c4221.46,3735.44) 4221.46,3758.37 cw(c4221.46,3781.31) v1@4205.24,3765.09 ; v1@4563.81,3613.99 ccw(c4547.59,3597.77) 4547.59,3620.71 ccw(c4547.59,3643.64) v1@4563.81,3627.43 ; v1@4566.64,3616.82 ccw(c4557.25,3607.43) 4557.25,3620.71 ccw(c4557.25,3633.99) v1@4566.64,3624.6
  Bottom Layer w4: v1@4570.52,3611.21 cw(c4570.52,3588.27) 4586.74,3604.49 cw(c4602.96,3620.71) v1@4580.02,3620.71 ; v1@4570.52,3615.21 cw(c4570.52,3601.93) 4579.91,3611.32 cw(c4589.3,3620.71) v1@4576.02,3620.71 ; v1(4570.52,3620.71) 4616.19,3575.04 4681.86,3575.04 4691.19,3565.71 4741.19,3565.71 4848.52,3458.37 4848.52,3350.04 4865.19,3333.37 4991.63,3333.37 5035,3290 5077.19,3290 5151.15,3216.04 5283.56,3216.04 5300.9,3233.37 5436.56,3233.37 5452.56,3249.37 5521.19,3249.37 5528.86,3241.71 5556.86,3241.71 5620.21,3178.35 5620.21,3163 5634.17,3149.04 5798.52,3149.04 5873.52,3224.04 5873.52,3291.71 6023.52,3441.71 6198.52,3441.71 6199.52,3442.71 6222.52,3442.71 6238.52,3426.71 6238.52,3423.37 6223.52,3408.37 6223.52,3375.04 6248.52,3350.04 6480.59,3350.04 6502.26,3328.37 6670,3328.37 6803.52,3328.37 6856.86,3275.04 6931.86,3275.04 6965.19,3241.71 v1(6965.19,3033.37) ; R187.2@4656.18,3141.88 4679.69,3141.87 4686.19,3135.37 v1(4686.19,3143.71) ; R187.2@4658.83,3141.87 ccw(c4658.83,3171.07) v1@4679.47,3150.43 ; R187.2@4659.94,3138.11 cw(c4669.02,3129.03) 4669.02,3141.87 cw(c4669.02,3154.72) R187.2@4659.94,3145.64 ; R187.2@4662.77,3135.29 cw(c4678.68,3119.38) 4678.68,3141.87 cw(c4678.68,3164.37) R187.2@4662.77,3148.46 ; 4667.68,3141.87 cw(c4667.68,3125.2) v1@4679.47,3136.99 ; 4668.49,3141.87 ccw(c4668.49,3161.41) v1@4682.3,3147.6 ; v1@6958.47,3040.09 ccw(c6942.26,3056.31) 6965.19,3056.31 ccw(c6988.13,3056.31) v1@6971.91,3040.09 ; v1@6961.3,3037.26 ccw(c6951.91,3046.65) 6965.19,3046.65 ccw(c6978.47,3046.65) v1@6969.08,3037.26
LEDS#.LED5.RED: J28.23 R185.2 U34.8 | length 5491.7
  Top Layer w4: v1@4198.27,3700.79 J28.23@4246.61,3700.79 J28.23@4248.52,3700.79 ; v1@4201.41,3696.15 cw(c4212.6,3684.96) 4212.6,3700.79 ; v1@4204.24,3693.32 cw(c4222.26,3675.3) J28.23@4222.26,3700.79 ; v1@4204.24,3706.76 ccw(c4218.66,3721.17) J28.23@4218.66,3700.79 ; J28.23@4220.33,3696.63 ccw(c4210.31,3686.61) 4210.31,3700.79 ccw(c4210.31,3714.97) J28.23@4220.33,3704.94 ; v1@4668.02,3175.04 cw(c4645.09,3175.04) 4661.31,3158.82 cw(c4677.52,3142.61) v1@4677.52,3165.54 ; v1@4672.02,3175.04 cw(c4658.75,3175.04) 4668.14,3165.65 cw(c4677.52,3156.26) v1@4677.52,3169.54 ; v1(4677.52,3175.04) 4631.52,3129.04 4631.52,3009.79 4648.19,2993.12 4648.19,2900.37 4706.86,2841.71 v1@4780.19,2841.71 ; 4754.9,2841.71 cw(c4754.9,2813.08) v1@4775.14,2833.32 ; 4762.95,2841.71 ccw(c4762.95,2858.95) v1@4775.14,2846.76 ; 4764.55,2841.71 cw(c4764.55,2822.74) v1@4777.97,2836.15 ; U34.8@7035.68,3013.63 cw(c7028.85,3006.8) 7038.5,3006.8 cw(c7048.16,3006.8) U34.8@7041.33,3013.63 ; U34.8@7038.5,3016.46 7038.5,2881.5 7110,2810 7110,2726.87 7068,2684.87 7068,2618.23 v1(7104.86,2581.37) ; v1@7095.36,2581.37 ccw(c7072.42,2581.37) 7088.64,2597.59 ccw(c7104.86,2613.81) v1@7104.86,2590.87 ; v1@7099.36,2581.37 ccw(c7086.08,2581.37) 7095.47,2590.76 ccw(c7104.86,2600.15) v1@7104.86,2586.87
  MidLayer2 w4: v1(4115.19,3641.71) 4173.52,3700.04 v1(4197.52,3700.04) ; v1@4115.19,3647.21 ccw(c4115.19,3660.49) 4124.58,3651.1 ccw(c4133.97,3641.71) v1@4120.69,3641.71 ; v1@4115.19,3651.21 ccw(c4115.19,3674.14) 4131.41,3657.93 ccw(c4147.63,3641.71) v1@4124.69,3641.71 ; v1@4190.81,3693.32 ccw(c4174.59,3677.11) 4174.59,3700.04 ccw(c4174.59,3722.98) v1@4190.81,3706.76 ; v1@4193.64,3696.15 ccw(c4184.25,3686.76) 4184.25,3700.04 ccw(c4184.25,3713.32) v1@4193.64,3703.93 ; v1@4529.19,3182.21 cw(c4529.19,3159.27) 4545.41,3175.49 cw(c4561.63,3191.71) v1@4538.69,3191.71 ; v1@4529.19,3186.21 cw(c4529.19,3172.93) 4538.58,3182.32 cw(c4547.97,3191.71) v1@4534.69,3191.71 ; v1(4529.19,3191.71) 4565.9,3155 4657.48,3155 v1(4677.52,3175.04) ; v1@4668.02,3175.04 cw(c4645.09,3175.04) 4661.31,3158.82 cw(c4677.52,3142.61) v1@4677.52,3165.54 ; v1@4672.02,3175.04 cw(c4658.75,3175.04) 4668.14,3165.65 cw(c4677.52,3156.26) v1@4677.52,3169.54
  Bottom Layer w4: v1@4108.47,3634.99 cw(c4092.26,3618.77) 4115.19,3618.77 cw(c4138.13,3618.77) v1@4121.91,3634.99 ; v1@4111.3,3637.82 cw(c4101.91,3628.43) 4115.19,3628.43 cw(c4128.47,3628.43) v1@4119.08,3637.82 ; v1(4115.19,3641.71) 4115.19,3586.37 4140.19,3561.37 4140.19,3491.71 4148.52,3483.37 4148.52,3203.02 4188.5,3163.04 4441.88,3163.04 4466.21,3187.37 4490,3187.37 4494.33,3191.71 v1(4529.19,3191.71) ; v1@4522.47,3184.99 ccw(c4506.26,3168.77) 4506.26,3191.71 ccw(c4506.26,3214.64) v1@4522.47,3198.43 ; v1@4525.3,3187.82 ccw(c4515.91,3178.43) 4515.91,3191.71 ccw(c4515.91,3204.99) v1@4525.3,3195.6 ; R185.2@4656.28,3196.94 cw(c4657.48,3181.46) 4668.46,3192.44 ; R185.2@4656.59,3192.95 cw(c4658.36,3170.05) 4674.6,3186.29 ; R185.2@4665.19,3195.71 4677.52,3183.37 v1(4677.52,3175.04) ; R185.2@4665.5,3198.26 ccw(c4672.4,3198.26) 4667.52,3193.38 ; R185.2@4666.39,3194.5 cw(c4651.73,3179.84) v1@4672.12,3176.05 ; 4671.76,3189.13 cw(c4660.79,3178.16) v1@4676.05,3175.32 ; v1(4781.86,2840.04) 5099.52,2840.04 5114.52,2825.04 5219.52,2825.04 5386.19,2658.37 5440.19,2658.37 5465.19,2683.37 5573.52,2683.37 5581.86,2691.71 5614.19,2691.71 5623.52,2682.37 5623.52,2670.04 5709.86,2583.71 5773.56,2583.71 5803.9,2553.37 6200.54,2553.37 6246.88,2507.04 6555.52,2507.04 6598.52,2550.04 6925.86,2550.04 6975.86,2600.04 7086.19,2600.04 v1(7104.86,2581.37) ; v1@4785.75,2836.15 cw(c4795.14,2826.76) 4795.14,2840.04 cw(c4795.14,2853.32) v1@4785.75,2843.93 ; v1@4788.57,2833.32 cw(c4804.79,2817.11) 4804.79,2840.04 cw(c4804.79,2862.98) v1@4788.57,2846.76 ; v1@7095.36,2581.37 ccw(c7072.42,2581.37) 7088.64,2597.59 ccw(c7104.86,2613.81) v1@7104.86,2590.87 ; v1@7099.36,2581.37 ccw(c7086.08,2581.37) 7095.47,2590.76 ccw(c7104.86,2600.15) v1@7104.86,2586.87
LEDS#.LED6.BLUE: J28.32 R189.2 U35.4 | length 4776.5
  Top Layer w4: J28.32@4323.39,3523.62 4358.19,3523.62 ; J28.32@4349.99,3519.82 cw(c4358.19,3512.88) 4358.19,3523.62 ; J28.32@4349.99,3527.42 ccw(c4358.19,3534.37) 4358.19,3523.62 ; v1@4471.02,3458.37 ccw(c4448.09,3458.37) 4464.31,3474.59 ccw(c4480.52,3490.81) v1@4480.52,3467.87 ; v1@4475.02,3458.37 ccw(c4461.75,3458.37) 4471.14,3467.76 ccw(c4480.52,3477.15) v1@4480.52,3463.87 ; v1(4480.52,3458.37) 4455.52,3483.37 4402.52,3483.37 4398.52,3487.37 4398.52,3516.71 4381.86,3533.37 4367.94,3533.37 4358.19,3523.62 ; v1@4643.14,3233.43 ccw(c4626.92,3249.64) 4649.86,3249.64 ccw(c4672.79,3249.64) 4656.57,3233.43 ccw(c4672.79,3249.64) 4672.79,3226.71 ccw(c4672.79,3203.77) v1@4656.57,3219.99 ; v1@4645.97,3230.6 ccw(c4636.58,3239.99) 4649.86,3239.99 ccw(c4663.14,3239.99) 4653.75,3230.6 ccw(c4663.14,3239.99) 4663.14,3226.71 ccw(c4663.14,3213.43) v1@4653.75,3222.82 ; v1@4676.36,3357.37 cw(c4653.42,3357.37) 4669.64,3341.16 cw(c4685.86,3324.94) v1@4685.86,3347.87 ; v1@4680.36,3357.37 cw(c4667.08,3357.37) 4676.47,3347.99 cw(c4685.86,3338.6) v1@4685.86,3351.87 ; v1(4685.86,3357.37) 4649.86,3321.37 v1(4649.86,3226.71) 4693.29,3226.71 4706.86,3213.14 4706.86,3017.71 v1(4740.19,2984.37) ; v1@4730.69,2984.37 ccw(c4707.76,2984.37) 4723.97,3000.59 ccw(c4740.19,3016.81) v1@4740.19,2993.87 ; v1@4734.69,2984.37 ccw(c4721.41,2984.37) 4730.8,2993.76 ccw(c4740.19,3003.15) v1@4740.19,2989.87 ; U35.4@7130,3093.23 7175.04,3093.23 v1(7190.19,3108.37) ; U35.4@7159.31,3090.4 cw(c7166.14,3083.57) 7166.14,3093.23 cw(c7166.14,3102.88) U35.4@7159.31,3096.06
  MidLayer2 w4: v1(5364.86,2975.04) 5395.73,2975.04 5402.69,2982 5533,2982 5624.52,2890.48 5624.52,2863.37 5638.52,2849.37 5811.88,2849.37 5843.88,2817.37 6039.52,2817.37 6074.19,2782.71 6140.52,2782.71 v1(6142.86,2780.37) ; v1@5368.75,2971.15 cw(c5378.14,2961.76) 5378.14,2975.04 cw(c5378.14,2988.32) v1@5368.75,2978.93 ; v1@5371.57,2968.32 cw(c5387.79,2952.11) 5387.79,2975.04 cw(c5387.79,2997.98) v1@5371.57,2981.76 ; 6114.29,2782.71 cw(c6114.29,2751.81) v1@6136.14,2773.66 ; 6123.95,2782.71 cw(c6123.95,2761.46) v1@6138.97,2776.49 ; 6125.55,2782.71 ccw(c6125.55,2797.68) v1@6136.14,2787.09
  Bottom Layer w4: v1(4480.52,3458.37) 4526.19,3458.37 4556.86,3427.71 4556.86,3412.71 4569.52,3400.04 4665.19,3400.04 4685.86,3379.37 ; v1@4484.41,3454.49 cw(c4493.8,3445.1) 4493.8,3458.37 cw(c4493.8,3471.65) v1@4484.41,3462.26 ; v1@4487.24,3451.66 cw(c4503.46,3435.44) 4503.46,3458.37 cw(c4503.46,3481.31) v1@4487.24,3465.09 ; v1@4644.74,3234.71 ccw(c4631.35,3255.62) 4656.18,3255.62 4656.18,3228.72 4658.19,3226.71 v1(4649.86,3226.71) ; v1@4646.89,3231.34 ccw(c4636.03,3248.31) R189.2@4656.18,3248.31 ; v1@4649.05,3227.97 ccw(c4640.71,3241) 4656.18,3241 ; R189.2@4649.59,3248.54 cw(c4633.68,3232.63) 4656.18,3232.63 cw(c4678.68,3232.64) R189.2@4662.77,3248.54 ; R189.2@4652.42,3251.37 cw(c4643.34,3242.29) 4656.18,3242.29 cw(c4669.02,3242.29) R189.2@4659.94,3251.37 ; v1@4679.34,3364.29 ccw(c4665.14,3379.37) 4685.86,3379.37 ; v1@4682.09,3361.38 ccw(c4673.86,3370.11) 4685.86,3370.11 ccw(c4697.85,3370.11) v1@4689.63,3361.38 ; v1(4685.86,3357.37) 4685.86,3379.37 ; v1@4692.37,3364.29 cw(c4706.58,3379.37) 4685.86,3379.37 ; v1@4738.42,2982.61 ccw(c4756.69,3000.87) 4756.69,2975.04 ; v1(4740.19,2984.37) 4749.52,2975.04 4920.48,2975.04 4995.48,3050.04 5065.19,3050.04 5131.86,2983.37 5151.88,2963.35 5164.86,2950.37 5217.56,2950.37 5226,2958.81 5254,2958.81 5271.11,2941.71 5315.19,2941.71 5348.52,2975.04 ; v1@4741.25,2985.44 ccw(c4766.35,3010.53) 4766.35,2975.04 ; v1@4744.08,2988.26 ccw(c4776,3020.19) 4776,2975.04 ; v1@4746.91,2991.09 ccw(c4785.66,3029.84) 4785.66,2975.04 ; v1@5356.6,2970.34 ccw(c5348.52,2965.75) 5348.52,2975.04 ; v1@5356.6,2979.74 cw(c5348.52,2984.33) 5348.52,2975.04 ; v1(5364.86,2975.04) 5348.52,2975.04 ; v1(6142.86,2780.37) 6190.52,2828.04 6309.21,2828.04 6331.88,2805.37 6406.86,2805.37 6443.19,2841.71 6601.51,2841.71 6627.17,2816.04 6828.21,2816.04 7120.54,3108.37 v1(7190.19,3108.37) ; v1@6142.86,2785.87 ccw(c6142.86,2799.15) 6152.25,2789.76 ccw(c6161.64,2780.37) v1@6148.36,2780.37 ; v1@6142.86,2789.87 ccw(c6142.86,2812.81) 6159.07,2796.59 ccw(c6175.29,2780.37) v1@6152.36,2780.37 ; v1@7183.47,3101.66 ccw(c7167.26,3085.44) 7167.26,3108.37 ccw(c7167.26,3131.31) v1@7183.47,3115.09 ; v1@7186.3,3104.49 ccw(c7176.91,3095.1) 7176.91,3108.37 ccw(c7176.91,3121.65) v1@7186.3,3112.26
LEDS#.LED6.GREEN: J28.35 R190.2 U35.6 | length 4311.7
  Top Layer w4: v1@4191.02,3411.37 ccw(c4168.09,3411.37) 4184.31,3427.59 ccw(c4200.52,3443.81) v1@4200.52,3420.87 ; v1@4195.02,3411.37 ccw(c4181.75,3411.37) 4191.13,3420.76 ccw(c4200.52,3430.15) v1@4200.52,3416.87 ; v1(4200.52,3411.37) 4181.86,3430.04 4181.86,3447.9 4198.52,3464.57 J28.35@4246.61,3464.57 ; J28.35@4220.33,3460.41 ccw(c4210.31,3450.39) 4210.31,3464.57 ccw(c4210.31,3478.75) J28.35@4220.33,3468.72 ; U35.6@7130,3042.05 7190,3042.05 7198.52,3033.52 v1(7198.52,2982.37) ; U35.6@7159.31,3039.22 cw(c7166.14,3032.39) 7166.14,3042.05 cw(c7166.14,3051.71) U35.6@7159.31,3044.88 ; v1@7191.81,2989.09 ccw(c7175.59,3005.31) 7198.52,3005.31 ccw(c7221.46,3005.31) v1@7205.24,2989.09 ; v1@7194.64,2986.26 ccw(c7185.25,2995.65) 7198.52,2995.65 ccw(c7211.8,2995.65) v1@7202.41,2986.26
  Bottom Layer w4: v1@4200.52,3401.87 cw(c4200.52,3378.94) 4216.74,3395.16 cw(c4232.96,3411.37) v1@4210.02,3411.37 ; v1@4200.52,3405.87 cw(c4200.52,3392.6) 4209.91,3401.99 cw(c4219.3,3411.37) v1@4206.02,3411.37 ; v1(4200.52,3411.37) 4261.86,3350.04 4396.86,3350.04 4398.52,3351.71 4398.52,3384.37 4405.86,3391.71 4438.86,3391.71 4488.86,3341.71 4626.97,3341.71 R190.2@4656.18,3312.5 4686.05,3312.5 4693.66,3304.89 4731.86,3266.71 4731.86,3225.04 4748.52,3208.37 4761.52,3208.37 4766.19,3203.71 4766.19,3174.04 4806.86,3133.37 4815.86,3124.37 5041.9,3124.37 5059.56,3142.04 5121.82,3142.04 5154.48,3109.37 5316.56,3109.37 5367.56,3058.37 5611.63,3058.37 5623.86,3046.14 5623.86,2928.52 5643.37,2909 5750.27,2909 5785,2874.27 5785,2824.81 5765.19,2805 5765.19,2789.55 5775.44,2779.3 5789.94,2779.3 5802.66,2792.02 5839.87,2792.02 5842.52,2789.37 5890.19,2741.71 5973.52,2741.71 5990.19,2758.37 6065.19,2758.37 6090.19,2733.37 6274.86,2733.37 6293.52,2752.04 6407.52,2752.04 6438.86,2783.37 6674.19,2783.37 6682.52,2791.71 6837.82,2791.71 6912.82,2866.71 7074.52,2866.71 7198.52,2990.71 v1(7198.52,2982.37) ; 4639.43,3329.25 ccw(c4656.18,3346) R190.2@4656.18,3322.31 ; 4640.62,3328.06 cw(c4625.55,3312.99) R190.2@4646.86,3312.99 ; R190.2@4646.26,3322.42 ccw(c4656.18,3332.34) R190.2@4656.18,3318.31 ; R190.2@4647.45,3321.23 cw(c4639.21,3312.99) R190.2@4650.86,3312.99 ; R190.2@4659.94,3308.74 cw(c4669.02,3299.66) 4669.02,3312.5 cw(c4669.02,3325.34) R190.2@4659.94,3316.26 ; R190.2@4662.77,3305.91 cw(c4678.68,3290) 4678.68,3312.5 cw(c4678.68,3335) R190.2@4662.77,3319.09 ; 7168.08,2960.26 cw(c7198.52,2929.82) v1@7198.52,2972.87 ; 7174.91,2967.09 cw(c7198.52,2943.48) v1@7198.52,2976.87 ; 7181.74,2973.92 cw(c7198.52,2957.14) v1@7198.52,2980.87
LEDS#.LED6.RED: J28.28 R188.2 U35.2 | length 11542.7
  Top Layer w4: J28.28@4323.39,3602.36 4331.86,3602.36 4331.86,3608.37 4341.52,3608.37 4349.86,3600.04 4414.86,3600.04 4423.52,3591.37 4423.52,3541.37 4473.19,3491.71 4498.52,3491.71 4506.86,3483.37 4506.86,3399.04 v1(4518.86,3387.04) ; J28.28@4346.84,3603.69 ccw(c4355.64,3612.49) 4355.64,3600.04 ; J28.28@4349.67,3598.21 cw(c4354.09,3593.79) 4354.09,3600.04 ; J28.28@4349.67,3606.52 ccw(c4365.3,3622.15) 4365.3,3600.04 ; 7089.68,3134.68 cw(c7103.52,3120.83) U35.2@7103.52,3140.41 ; 7090,3115.19 7090,3135 7099.41,3144.41 U35.2@7130,3144.41 U35.2@7131.86,3144.41 ; 7090.19,3115 7090.19,2925.04 7156.86,2858.37 7156.86,2658.37 7173.52,2641.71 7331.86,2641.71 7348.52,2625.04 7348.52,2491.37 v1(7373.19,2466.71) ; 7096.5,3141.5 cw(c7103.52,3134.49) U35.2@7103.52,3144.41 ; v1@7363.69,2466.71 ccw(c7340.76,2466.71) 7356.97,2482.93 ccw(c7373.19,2499.14) v1@7373.19,2476.21 ; v1@7367.69,2466.71 ccw(c7354.41,2466.71) 7363.8,2476.1 ccw(c7373.19,2485.49) v1@7373.19,2472.21 ; v1(7411.52,2491.71) 7427.19,2491.71 7431.86,2487.04 7431.86,2450.04 7465.19,2416.71 7465.19,2366.71 7481.86,2350.04 7548.52,2350.04 7557.5,2341.06 7557.5,2322.75 ; 7556.86,2322.11 7556.86,2150.04 7590.19,2116.71 7590.19,2012.39 7567.5,1989.7 7567.5,1962.75 7622.75,1907.5 7655,1907.5 7664.5,1917 7745.85,1917 ; v1(7631.86,258.37) 7655,281.52 7655,1250 7840.19,1435.19 7840.19,1891.71 7814.4,1917.5 7745.85,1917.5 ; v1@7631.86,263.87 ccw(c7631.86,277.15) 7641.25,267.76 ccw(c7650.64,258.37) v1@7637.36,258.37 ; v1@7631.86,267.87 ccw(c7631.86,290.81) 7648.07,274.59 ccw(c7664.29,258.37) v1@7641.36,258.37
  MidLayer1 w4: v1@4748.69,3233.37 cw(c4725.76,3233.37) 4741.97,3217.16 cw(c4758.19,3200.94) v1@4758.19,3223.87 ; v1@4752.69,3233.37 cw(c4739.41,3233.37) 4748.8,3223.99 cw(c4758.19,3214.6) v1@4758.19,3227.87 ; v1(4758.19,3233.37) 4723.52,3198.71 4723.52,3175.04 4740.19,3158.37 4798.52,3158.37 4807.52,3149.37 4807.52,2775.71 4656.86,2625.04 4656.86,1915 4606.52,1864.67 4606.52,1038.48 4619.96,1025.04 4690,1025.04 4700,1035.04 4700,1064.2 4797.8,1162 4872.27,1162 5032.19,1002.08 5032.19,294.12 5176.31,150 5645,150 5730,235 6263.69,235 6393.69,105 7478.48,105 v1(7631.86,258.37) ; v1@7622.36,258.37 cw(c7599.42,258.37) 7615.64,242.16 cw(c7631.86,225.94) v1@7631.86,248.87 ; v1@7626.36,258.37 cw(c7613.08,258.37) 7622.47,248.99 cw(c7631.86,239.6) v1@7631.86,252.87
  Bottom Layer w4: v1(4518.86,3387.04) 4523.52,3391.71 4633.85,3391.71 R188.2@4656.18,3369.38 ; v1@4519.92,3385.98 cw(c4533.75,3372.15) 4533.75,3391.71 ; v1@4522.75,3383.15 cw(c4543.4,3362.5) 4543.4,3391.71 ; v1@4525.57,3380.32 cw(c4553.06,3352.84) 4553.06,3391.71 ; v1@4525.57,3393.76 ccw(c4530.53,3398.71) 4530.53,3391.71 ; 4639.43,3386.12 ccw(c4656.18,3402.87) R188.2@4656.18,3379.19 ; 4640.62,3384.94 cw(c4625.55,3369.87) R188.2@4646.86,3369.87 ; R188.2@4646.26,3379.29 ccw(c4656.18,3389.21) R188.2@4656.18,3375.19 ; R188.2@4647.45,3378.11 cw(c4639.21,3369.87) R188.2@4650.86,3369.87 ; R188.2@4656.86,3358.37 4675.52,3339.71 4715.19,3339.71 4731.19,3323.71 4731.19,3281.71 4758.19,3254.71 ; R188.2@4657.45,3368.51 ccw(c4671.35,3364.39) 4661.1,3354.13 ; R188.2@4661.28,3367.37 ccw(c4678.69,3362.22) 4665.85,3349.38 ; R188.2@4665.12,3366.24 ccw(c4686.03,3360.05) 4670.61,3344.62 ; v1@4751.83,3240.44 ccw(c4738.99,3254.71) 4758.19,3254.71 ; v1@4754.51,3237.46 ccw(c4747.07,3245.72) 4758.19,3245.72 ccw(c4769.31,3245.72) v1@4761.87,3237.46 ; v1(4758.19,3233.37) 4758.19,3254.71 ; v1@4764.55,3240.44 cw(c4777.39,3254.71) 4758.19,3254.71 ; v1@7373.1,2460.21 ccw(c7373.33,2476.37) 7384.76,2464.94 ; v1@7373.15,2464.21 ccw(c7373.52,2489.56) 7391.45,2471.63 ; v1(7373.19,2466.71) 7386.52,2466.71 v1(7411.52,2491.71) cw(c7374.09,2529.14) v1@7373.33,2476.21 ; v1@7373.21,2468.21 ccw(c7373.71,2502.75) 7398.14,2478.32 ; v1@7373.27,2472.21 ccw(c7373.9,2515.95) v1@7404.83,2485.01 ; v1@7402.02,2491.71 cw(c7379.09,2491.71) 7395.31,2475.49 cw(c7411.52,2459.27) v1@7411.52,2482.21 ; v1@7406.02,2491.71 cw(c7392.75,2491.71) 7402.14,2482.32 cw(c7411.52,2472.93) v1@7411.52,2486.21
LEDS#.LED7.BLUE: J28.36 R192.2 U35.10 | length 7745.2
  Top Layer w4: J28.36@4323.39,3444.88 4337.7,3444.88 4367.86,3475.04 4415.19,3475.04 4431.86,3458.37 v1(4431.86,3455.04) ; J28.36@4343.39,3444.88 cw(c4357.12,3444.88) 4347.41,3454.59 ; J28.36@4347.39,3444.88 cw(c4370.77,3444.88) 4354.24,3461.42 ; J28.36@4351.39,3444.88 cw(c4384.43,3444.88) 4361.06,3468.25 ; 4420.27,3469.96 cw(c4405.58,3455.27) v1@4426.36,3455.09 ; 4421.33,3468.9 ccw(c4431.86,3479.43) v1@4431.86,3464.54 ; v1@4576.86,3446.87 cw(c4576.86,3423.94) 4593.07,3440.16 cw(c4609.29,3456.37) v1@4586.36,3456.37 ; v1@4576.86,3450.87 cw(c4576.86,3437.6) 4586.25,3446.99 cw(c4595.64,3456.37) v1@4582.36,3456.37 ; v1(4576.86,3456.37) 4606.86,3426.37 4606.86,3175.04 4594.07,3162.26 4560.3,3162.26 4531.52,3133.48 4531.52,2686.69 4698.52,2519.69 v4(4698.52,1955) ; v1(6756.86,1399.04) 6791.19,1433.37 6948.52,1433.37 6976.9,1405 7101.9,1405 7131.86,1375.04 7323.52,1375.04 7340.19,1358.37 7340.19,1299.81 ; v1@6756.86,1404.54 ccw(c6756.86,1417.82) 6766.25,1408.43 ccw(c6775.64,1399.04) v1@6762.36,1399.04 ; v1@6756.86,1408.54 ccw(c6756.86,1431.48) 6773.07,1415.26 ccw(c6789.29,1399.04) v1@6766.36,1399.04 ; 7340,1300 7340.19,1299.81 ; U35.10@7348.5,3066.71 7373.52,3066.71 7390.19,3050.04 7390.19,2941.71 7323.52,2875.04 7323.52,2675.04 7356.86,2641.71 7356.86,2508.37 7448.52,2416.71 7448.52,1328.33 7456.86,1320 7456.86,1295 7446.86,1285 7355,1285 7340.19,1299.81 ; U35.10@7378.98,3067.64 ccw(c7394.41,3067.64) 7383.5,3056.73
  MidLayer1 w4: v1(4431.86,3455.04) v1(4493.52,3516.71) ; v1@4431.86,3460.54 ccw(c4431.86,3473.82) 4441.25,3464.43 ccw(c4450.64,3455.04) v1@4437.36,3455.04 ; v1@4431.86,3464.54 ccw(c4431.86,3487.48) 4448.07,3471.26 ccw(c4464.29,3455.04) v1@4441.36,3455.04 ; v1@4484.02,3516.71 cw(c4461.09,3516.71) 4477.31,3500.49 cw(c4493.52,3484.27) v1@4493.52,3507.21 ; v1@4488.02,3516.71 cw(c4474.75,3516.71) 4484.14,3507.32 cw(c4493.52,3497.93) v1@4493.52,3511.21
  MidLayer2 w4: v4(4698.52,1955) 4732.86,1955 5013.15,1674.71 5404.82,1674.71 5562.82,1516.71 6143.17,1516.71 6284.84,1375.04 6485,1375.04 6509,1399.04 v1(6756.86,1399.04) ; v4@4702.63,1950.89 cw(c4712.55,1940.97) 4712.55,1955 cw(c4712.55,1969.03) v4@4702.63,1959.11 ; v4@4705.46,1948.06 cw(c4722.21,1931.31) 4722.21,1955 cw(c4722.21,1978.69) v4@4705.46,1961.94 ; v1@6750.14,1392.32 ccw(c6733.92,1376.11) 6733.92,1399.04 ccw(c6733.92,1421.98) v1@6750.14,1405.76 ; v1@6752.97,1395.15 ccw(c6743.58,1385.76) 6743.58,1399.04 ccw(c6743.58,1412.32) v1@6752.97,1402.93
  Bottom Layer w4: v1(4493.52,3516.71) 4516.52,3516.71 v1(4576.86,3456.37) 4579.86,3456.37 4581.86,3458.37 4630.86,3458.37 4655.86,3433.37 4656.18,3433.37 R192.2@4656.18,3426.25 ; v1@4497.41,3512.82 cw(c4506.8,3503.43) 4506.8,3516.71 cw(c4506.8,3529.99) v1@4497.41,3520.6 ; v1@4500.24,3509.99 cw(c4516.46,3493.77) 4516.46,3516.71 cw(c4516.46,3539.64) v1@4500.24,3523.43 ; v1@4567.36,3456.37 ccw(c4544.42,3456.37) 4560.64,3472.59 ccw(c4576.86,3488.81) v1@4576.86,3465.87 ; v1@4571.36,3456.37 ccw(c4558.08,3456.37) 4567.47,3465.76 ccw(c4576.86,3475.15) v1@4576.86,3461.87 ; v1@4580.75,3452.49 cw(c4594.96,3438.27) 4594.96,3458.37 cw(c4594.96,3474.48) v1@4583.57,3463.09 ; v1@4583.57,3449.66 cw(c4604.62,3428.61) 4604.62,3458.37 ; 4635.81,3453.42 cw(c4609.13,3426.74) R192.2@4646.86,3426.74 ; 4642.64,3446.59 cw(c4622.79,3426.74) R192.2@4650.86,3426.74 ; 4649.47,3439.76 cw(c4636.45,3426.74) R192.2@4654.86,3426.74 ; 4651.04,3438.19 ccw(c4656.18,3443.33) R192.2@4656.18,3436.06 ; R192.2@4656.18,3426.25 4656.18,3425.76 R192.2@4656.18,3426.25